# Altium PCB PCB1.PcbDoc (part 1 of 3)
Units mm, origin at the board's own origin, x right, y up, seen from the top; angles counter-clockwise.
Board outline 35.05 x 35.05 mm, 2 copper layers (Top Layer, Bottom Layer); 270 components, 213 nets, 927 pads, 0 vias.
Unrouted connection lines stored in the file: 589.
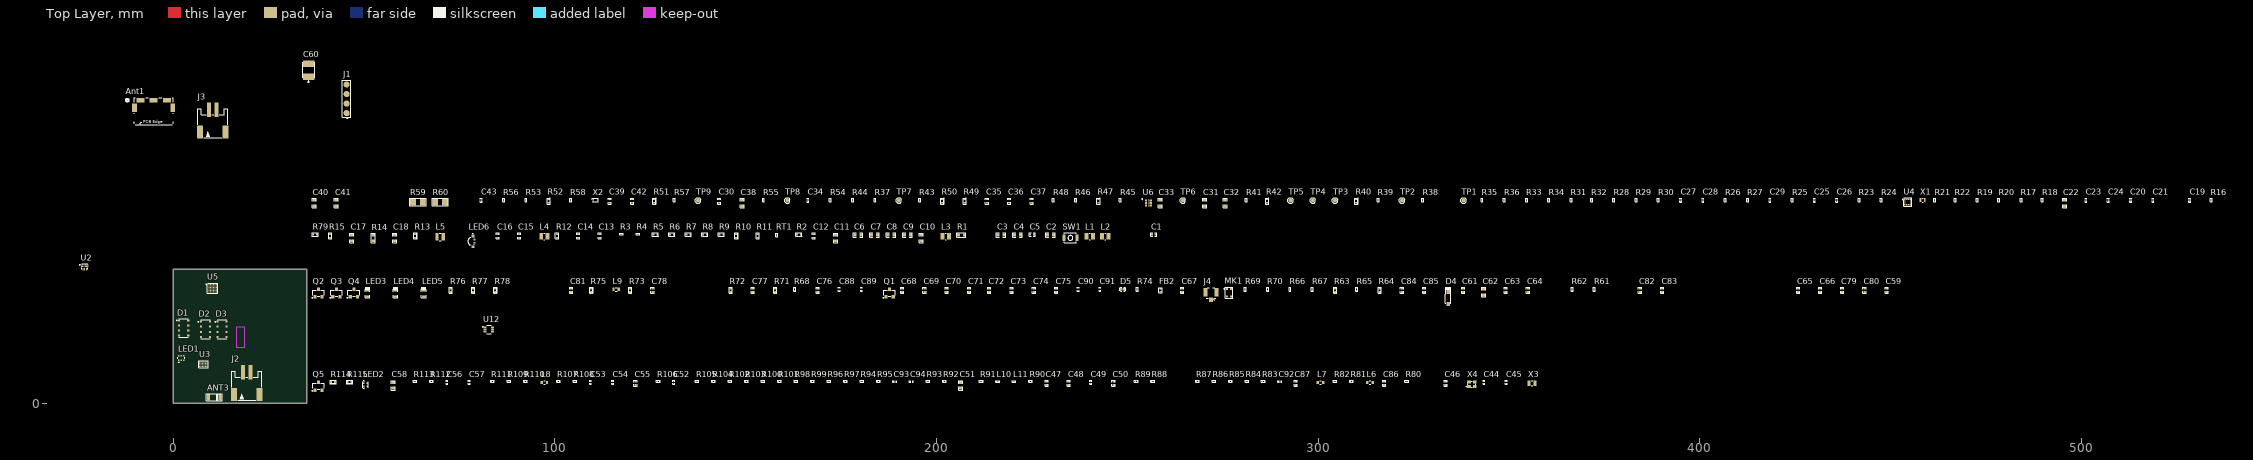
[diagram p0: Top Layer view]
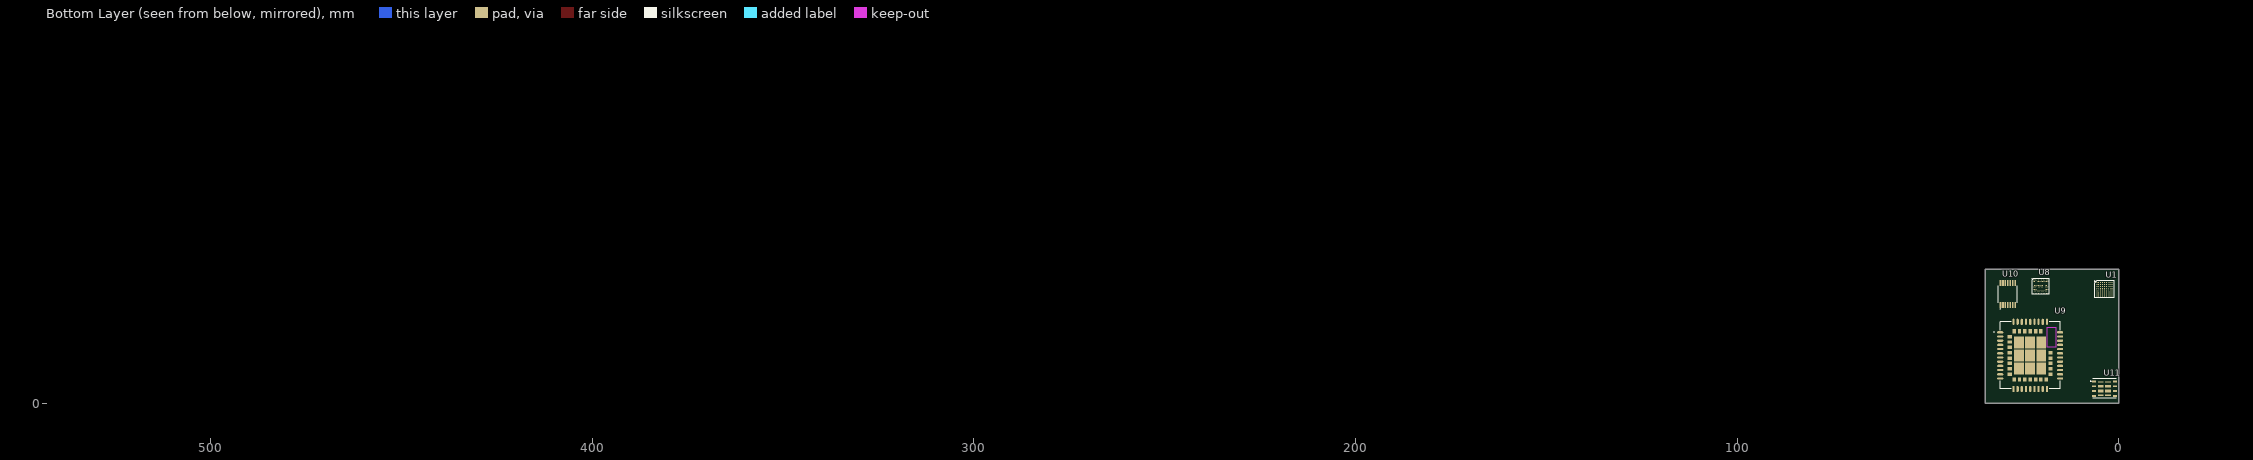
[diagram p1: Bottom Layer view, seen from below]

## Layer stack, top to bottom
Top Solder: solder mask 0.0102, Solder Resist, Dk 3.5
Top Layer: signal copper 0.0356
Dielectric 1: dielectric 0.32, FR-4, Dk 4.8
Bottom Layer: signal copper 0.0356
Bottom Solder: solder mask 0.0102, Solder Resist, Dk 3.5

## Board outline
0,0 35.052,0 35.052,35.052 0,35.052

## Design rules (kind name [scope] priority, off if disabled: settings)
Clearance [All] p1: gap=0.254 ignorepadtopadclearanceinfootprint=FALSE except(0: Arc-Hole Track-Hole SMDPad-Hole THPad-Hole Via-Hole Fill-Hole Poly-Hole Region-Hole Text-Hole)
DiffPairsRouting [All] p1: maxlimit=0.254 minlimit=0.254 mostfreqgap=0.254 toplayer_minwidth=0.381 toplayer_maxwidth=0.381 toplayer_prefwidth=0.381 bottomlayer_minwidth=0.381 bottomlayer_maxwidth=0.381 bottomlayer_prefwidth=0.381 maxuncoupledlength=12.7
PolygonConnect [All] p1: connectstyle=Relief reliefconductorwidth=0.254 reliefentries=4 polygonreliefangle="90 Angle" airgapwidth=0.254
RoutingVias [All] p1: holewidth=0.711 width=1.27 viastyle="Through Hole" minholewidth=0.711 minwidth=1.27 maxholewidth=0.711 maxwidth=1.27
SolderMaskExpansion [All] p1: expansion=0.102 istentingtop=FALSE
SupplyNets "Schematic Supply Nets_15" [InNet('VBUS')] p1: voltage=0.000
SupplyNets "Schematic Supply Nets_14" [InNet('5V')] p2: voltage=0.000
SupplyNets "Schematic Supply Nets_13" [InNet('VBAT')] p3: voltage=0.000
SupplyNets "Schematic Supply Nets_12" [InNet('3V3_SFO')] p4: voltage=0.000
SupplyNets "Schematic Supply Nets_11" [InNet('1V8_SLDO')] p5: voltage=0.000
SupplyNets "Schematic Supply Nets_10" [InNet('1V8_SB')] p6: voltage=0.000
SupplyNets "Schematic Supply Nets_9" [InNet('AGND')] p7: voltage=0.000
SupplyNets "Schematic Supply Nets_8" [InNet('GND')] p8: voltage=0.000
SupplyNets "Schematic Supply Nets_7" [InNet('3V3')] p9: voltage=0.000
SupplyNets "Schematic Supply Nets_6" [InNet('5V0_B')] p10: voltage=0.000
SupplyNets "Schematic Supply Nets_5" [InNet('VGSM')] p11: voltage=0.000
SupplyNets "Schematic Supply Nets_4" [InNet('VDD_EXT')] p12: voltage=0.000
SupplyNets "Schematic Supply Nets_3" [InNet('1V8_D')] p13: voltage=0.000
SupplyNets "Schematic Supply Nets_2" [InNet('VDD_uC')] p14: voltage=0.000
SupplyNets "Schematic Supply Nets_1" [InNet('VSYS')] p15: voltage=0.000
SupplyNets "Schematic Supply Nets" [InNet('1V8_S')] p16: voltage=0.000
Width [All] p1: maxlimit=0.254 minlimit=0.254 preferedwidth=0.254
29 further rules are at their usual default settings.

## Classes and differential pairs
component class U_Sensor-Sheet: C19 C20 C21 C22 C23 C24 C25 C26 C27 C28 C29 C30 C31 C32 C33 C34 C35 C36 C37 C38 C39 C40 C41 C42 C43 D1 D2 D3 LED1 R16 R17 R18 R19 R20 R21 R22 R23 R24 R25 R26 R27 R28 R29 R30 R31 R32 R33 R34 R35 R36 R37 R38 R39 R40 R41 R42 R43 R44 R45 R46 R47 R48 R49 R50 R51 R52 R53 R54 R55 R56 R57 R58 R59 R60 TP1 TP2 TP3 TP4 TP5 TP6 TP7 TP8 TP9 U3 U4 U5 U6 X1 X2
component class U_Power-Sheet: C1 C2 C3 C4 C5 C6 C7 C8 C9 C10 C11 C12 C13 C14 C15 C16 C17 C18 J1 J2 L1 L2 L3 L4 L5 LED6 R1 R2 R3 R4 R5 R6 R7 R8 R9 R10 R11 R12 R13 R14 R15 R79 RT1 SW1 U1 U2
component class U_GSM-Sheet: Ant1 C59 C60 C61 C62 C63 C64 C65 C66 C67 C68 C69 C70 C71 C72 C73 C74 C75 C76 C77 C78 C79 C80 C81 C82 C83 C84 C85 C88 C89 C90 C91 D4 D5 FB2 J3 J4 L9 LED3 LED4 LED5 MK1 Q1 Q2 Q3 Q4 R61 R62 R63 R64 R65 R66 R67 R68 R69 R70 R71 R72 R73 R74 R75 R76 R77 R78 U9 U10 U11 U12
component class U_Controller-Sheet: ANT3 C44 C45 C46 C47 C48 C49 C50 C51 C52 C53 C54 C55 C56 C57 C58 C86 C87 C93 C94 L6 L7 L8 L10 L11 LED2 Q5 R79 R80 R81 R82 R83 R84 R85 R86 R87 R88 R89 R90 R91 R92 R93 R94 R95 R96 R97 R98 R99 R100 R101 R102 R103 R104 R105 R106 R107 R108 R109 R110 R112 R113 R114 R115 U8 X3 X4
differential pair class SPK_Pair: LSPK
differential pair class MIC_Pair: MIC
net class SPK: LSPK_N LSPK_P
net class MIC: MIC_N MIC_P
differential pair MIC: +MIC_P -MIC_N
differential pair LSPK: +LSPK_P -LSPK_N

## Components (designator, comment, footprint, x,y, rotation, side; value= is the part's Value field where it differs from the comment)
Ant1 "AP.10H.01" AP.10H.01 -5.08,77.089 r0 top
ANT3 "2.4GHZ" RFANT3216120A5T 10.795,1.524 r180 top
C1 "2.2uF" Cap-0402 256.921,44.196 r0 top
C2 "10uF" Cap-0603 229.87,44.069 r0 top
C3 "10uF" Cap-0603 216.916,44.069 r0 top
C4 "10uF" Cap-0603 221.234,44.069 r0 top
C5 "4.7uF" Cap-0402 225.044,44.196 r0 top
C6 "10uF" Cap-0603 179.451,44.069 r0 top
C7 "10uF" Cap-0603 183.769,44.069 r0 top
C8 "22uF" Cap-0603 188.087,44.069 r0 top
C9 "22uF" Cap-0603 192.405,44.069 r0 top
C10 "22uF" Cap-0603 195.961,43.307 r90 top
C11 "10uF" Cap-0603 173.609,43.307 r90 top
C12 "100nF" Cap-0402 167.894,43.815 r90 top
C13 "4.7uF" Cap-0402 111.76,43.815 r90 top
C14 "2.2uF" Cap-0402 106.172,43.815 r90 top
C15 "4.7uF" Cap-0402 90.678,43.815 r90 top
C16 "4.7uF" Cap-0402 85.09,43.815 r90 top
C17 "22uF" Cap-0603 46.863,43.307 r90 top
C18 "22uF" Cap-0603 58.039,43.307 r90 top
C19 "1uF" CAP-0201 528.32,53.213 r90 top
C20 "0.1uF" CAP-0201 512.826,53.213 r90 top
C21 "1uF" CAP-0201 518.668,53.213 r90 top
C22 "10uF" Cap-0603 495.554,52.451 r90 top
C23 "0.1uF" CAP-0201 501.142,53.213 r90 top
C24 "0.1uF" CAP-0201 506.984,53.213 r90 top
C25 "0.1uF" CAP-0201 430.022,53.213 r90 top
C26 "1uF" CAP-0201 435.864,53.213 r90 top
C27 "DNP" CAP-0201 394.97,53.213 r90 top
C28 "DNP" CAP-0201 400.812,53.213 r90 top
C29 "4700pF" CAP-0201 418.338,53.213 r90 top value=4.7nF
C30 "DNP" Cap-0402 143.129,52.959 r90 top value=100nF
C31 "0.1uF" Cap-0603 270.256,52.451 r90 top
C32 "10uF" Cap-0603 275.59,52.451 r90 top
C33 "1uF" Cap-0603 258.572,52.451 r90 top
C34 "1uF" CAP-0201 166.37,53.213 r90 top
C35 "10uF" Cap-0402 213.233,52.959 r90 top
C36 "10uF" Cap-0402 219.075,52.959 r90 top
C37 "1uF" Cap-0402 224.917,52.959 r90 top
C38 "10uF" Cap-0603 149.098,52.451 r90 top
C39 "DNP" Cap-0402 114.427,52.959 r90 top value=100nF
C40 "10uF" Cap-0603 36.957,52.451 r90 top
C41 "10uF" Cap-0603 42.799,52.451 r90 top
C42 "DNP" Cap-0402 120.269,52.959 r90 top value=100nF
C43 "10nF" CAP-0201 80.772,53.213 r90 top
C44 "DNP" CAP-0201 343.408,5.461 r90 top
C45 "DNP" CAP-0201 349.25,5.461 r90 top
C46 "1uF" Cap-0402 333.375,5.207 r90 top
C47 "1uF" Cap-0402 228.854,5.207 r90 top
C48 "1uF" Cap-0402 234.696,5.207 r90 top
C49 "0.1uF" CAP-0201 240.411,5.461 r90 top
C50 "1uF" Cap-0402 246.38,5.207 r90 top
C51 "4.7uF" Cap-0603 206.375,4.699 r90 top
C52 "0.1uF" CAP-0201 131.191,5.461 r90 top
C53 "0.1uF" CAP-0201 109.347,5.461 r90 top
C54 "0.1uF" CAP-0201 115.189,5.461 r90 top
C55 "1uF" Cap-0402 121.158,5.207 r90 top
C56 "0.1uF" CAP-0201 71.755,5.461 r90 top
C57 "0.1uF" CAP-0201 77.597,5.461 r90 top
C58 "2.2uF" Cap-0603 57.658,4.699 r90 top
C59 "0.1uF" Cap-0402 448.945,29.591 r90 top value=100nF
C60 "100uF" Case-B 35.56,87.249 r90 top
C61 "100nF" Cap-0402 337.947,29.591 r90 top
C62 "10uF" CAP-0603 343.408,29.083 r90 top
C63 "10pF" Cap-0402 349.123,29.591 r90 top
C64 "30pF" Cap-0402 354.965,29.591 r90 top
C65 "100nF" Cap-0402 425.704,29.591 r90 top
C66 "100nF" Cap-0402 431.546,29.591 r90 top
C67 "10uF" Cap-0402 264.414,29.591 r90 top
C68 "10pF" Cap-0402 191.008,29.591 r90 top
C69 "30pF" Cap-0402 196.85,29.591 r90 top
C70 "10pF" Cap-0402 202.692,29.591 r90 top
C71 "30pF" Cap-0402 208.534,29.591 r90 top
C72 "33pF" Cap-0402 213.868,29.591 r90 top
C73 "33pF" Cap-0402 219.71,29.591 r90 top
C74 "0.1uF" Cap-0402 225.552,29.591 r90 top value=100nF
C75 "10uF" Cap-0402 231.394,29.591 r90 top
C76 "100nF" Cap-0402 168.91,29.591 r90 top
C77 "33pF" Cap-0402 151.892,29.591 r90 top
C78 "33pF" Cap-0402 125.603,29.591 r90 top
C79 "10pF" Cap-0402 437.261,29.591 r90 top
C80 "30pF" Cap-0402 443.103,29.591 r90 top
C81 "33pF" Cap-0402 104.267,29.591 r90 top
C82 "10pF" Cap-0402 384.302,29.591 r90 top
C83 "30pF" Cap-0402 390.144,29.591 r90 top
C84 "10pF" Cap-0402 321.945,29.591 r90 top
C85 "30pF" Cap-0402 327.787,29.591 r90 top
C86 "1uF" Cap-0402 317.246,5.207 r90 top
C87 "1uF" Cap-0402 294.132,5.207 r90 top
C88 "DNP" CAP-0201 174.498,29.845 r90 top
C89 "DNP" CAP-0201 180.34,29.845 r90 top
C90 "DNP" CAP-0201 237.109,29.845 r90 top
C91 "DNP" CAP-0201 242.824,29.845 r90 top
C92 "2.2nF" CAP-0201 289.941,5.715 r0 top
C93 "0.7pF" CAP-0201 189.103,5.715 r0 top
C94 "DNP" CAP-0201 193.421,5.715 r0 top
D1 "VEMD8080" VEMD8080 2.794,19.685 r0 top
D2 "VEMD8080" VEMD8080 8.462,19.359 r0 top
D3 "VEMD8080" VEMD8080 12.827,19.359 r0 top
D4 "MMSZ5231BT1G" SOD-123 334.01,27.559 r90 top
D5 "LXES15AAA1-153" "DFN1006-2L (Bi-Directional)" 248.793,29.845 r0 top
FB2 "100MHz" IND-0402 258.699,29.591 r90 top
J1 "POGO Connector 4 Pin" "Pogo 4 Pin" 45.466,79.736 r90 top
J2 "S2B-PH-SM4-TB(LF)(SN)" S2B-PH-SM4-TB(LF)(SN) 19.304,5.207 r0 top
J3 "S2B-PH-SM4-TB(LF)(SN)" S2B-PH-SM4-TB(LF)(SN) 10.414,73.914 r0 top
J4 "U.FL-R-SMT-1(80)" U.FL-R-SMT-1(80)_ 271.907,28.067 r0 top
L1 "2.2uH" IND-0806 240.157,43.688 r0 top
L2 "2.2uH" IND-0806 244.221,43.688 r0 top
L3 "2.2uH" IND-0806 202.438,43.688 r0 top
L4 "2.2uH" IND-0806 97.282,43.688 r0 top
L5 "1uH" WPN252012H1R0MT_ 69.977,43.561 r0 top
L6 "10uH" "IND-0603 (1608 Metric)" 313.563,5.461 r0 top value=1.05R
L7 "10uH" "IND-0603 (1608 Metric)" 300.609,5.461 r0 top value=1.05R
L8 "10uH" "IND-0603 (1608 Metric)" 97.282,5.461 r0 top value=1.05R
L9 "68nH" "IND-0603 (1608 Metric)" 116.078,29.845 r0 top
L10 "2.2nH" IND-0201 216.027,5.715 r0 top value=120mR
L11 "2.2nH" IND-0201 220.345,5.715 r0 top value=120mR
LED1 "SFH 7016" "SFH 7016" 2.159,11.811 r90 top
LED2 "XL-1010RGBC-WS2812B" XL-1010RGBC-WS2812B 50.419,4.826 r90 top
LED3 "Yellow" LED-0603 50.927,28.702 r90 top
LED4 "RED" LED-0603 58.293,28.702 r90 top
LED5 "Emerald" LED-0603 65.659,28.702 r90 top
LED6 "MHS110FRGBCT" MHS110FRGBCT 78.74,42.418 r90 top
MK1 "ZTS6117" ZTS6117_ 276.606,28.956 r0 top
Q1 "DDTC143ZCA-7-F" SOT-23 187.706,28.829 r0 top
Q2 "DDTC143ZCA-7-F" SOT-23 38.1,28.829 r0 top
Q3 "DDTC143ZCA-7-F" SOT-23 42.799,28.829 r0 top
Q4 "DDTC143ZCA-7-F" SOT-23 47.371,28.829 r0 top
Q5 "BSS138" Sot-23 38.1,4.445 r0 top
R1 "25K" Res-0603 206.502,44.069 r0 top
R2 "10K" Res-0402 163.957,44.196 r0 top
R3 "4.7K" Res-0201 117.475,44.323 r0 top
R4 "4.7K" Res-0201 121.793,44.323 r0 top
R5 "10K" Res-0402 126.365,44.196 r0 top
R6 "10K" Res-0402 130.683,44.196 r0 top
R7 "10K" Res-0402 135.001,44.196 r0 top
R8 "10K" Res-0402 139.319,44.196 r0 top
R9 "10K" Res-0402 143.637,44.196 r0 top
R10 "10K" Res-0402 147.574,43.815 r90 top
R11 "4.7K" Res-0402 153.162,43.815 r90 top
R12 "10mR" Res-0402 100.584,43.815 r90 top
R13 "100K" Res-0402 63.5,43.815 r90 top
R14 "215K" Res-0603 52.451,43.307 r90 top
R15 "43k" Res-0402 41.148,43.815 r90 top
R16 "10R" Res-0201 533.908,53.213 r90 top
R17 "0R" Res-0201 484.124,53.213 r90 top
R18 "0R" Res-0201 489.712,53.213 r90 top
R19 "0R" Res-0201 472.694,53.213 r90 top
R20 "0R" Res-0201 478.282,53.213 r90 top
R21 "0R" Res-0201 461.518,53.213 r90 top
R22 "0R" Res-0201 466.852,53.213 r90 top
R23 "3.3K" Res-0201 441.706,53.213 r90 top
R24 "DNP" Res-0201 447.548,53.213 r90 top
R25 "0R" Res-0201 424.18,53.213 r90 top
R26 "10K" Res-0201 406.654,53.213 r90 top
R27 "0R" Res-0201 412.496,53.213 r90 top
R28 "0R" Res-0201 377.444,53.213 r90 top
R29 "0R" Res-0201 383.286,53.213 r90 top
R30 "0R" Res-0201 389.128,53.213 r90 top
R31 "0R" Res-0201 366.268,53.213 r90 top
R32 "DNP" Res-0201 371.602,53.213 r90 top
R33 "0R" Res-0201 354.584,53.213 r90 top
R34 "0R" Res-0201 360.426,53.213 r90 top
R35 "3.3K" Res-0201 342.9,53.213 r90 top
R36 "10K" Res-0201 348.742,53.213 r90 top
R37 "0R" Res-0201 183.896,53.213 r90 top
R38 "DNP" Res-0201 327.406,53.213 r90 top
R39 "0R" Res-0201 315.722,53.213 r90 top
R40 "DNP" Res-0402 310.007,52.959 r90 top
R41 "0R" Res-0201 281.178,53.213 r90 top
R42 "DNP" Res-0402 286.639,52.959 r90 top
R43 "10K" Res-0201 195.58,53.213 r90 top
R44 "DNP" Res-0201 178.054,53.213 r90 top
R45 "0R" Res-0201 248.158,53.213 r90 top
R46 "0R" Res-0201 236.474,53.213 r90 top
R47 "DNP" Res-0402 242.443,52.959 r90 top
R48 "0R" Res-0201 230.632,53.213 r90 top
R49 "DNP" Res-0402 207.391,52.959 r90 top
R50 "100K" Res-0402 201.549,52.959 r90 top
R51 "10K" Res-0402 126.111,52.959 r90 top
R52 "10K" Res-0402 98.425,52.959 r90 top
R53 "DNP" Res-0201 92.456,53.213 r90 top
R54 "DNP" Res-0201 172.212,53.213 r90 top
R55 "0R" Res-0201 154.686,53.213 r90 top
R56 "DNP" Res-0201 86.614,53.213 r90 top
R57 "0R" Res-0201 131.318,53.213 r90 top
R58 "0R" Res-0201 104.14,53.213 r90 top
R59 "0R" Res-1206 64.135,52.705 r0 top value=0mR
R60 "0R" Res-1206 69.977,52.705 r0 top value=0mR
R61 "0R" Res-0201 372.364,29.845 r90 top
R62 "0R" Res-0201 366.522,29.845 r90 top
R63 "10K" Res-0402 304.419,29.591 r90 top
R64 "DNP" Res-0402 316.103,29.591 r90 top
R65 "0R" Res-0201 310.134,29.845 r90 top
R66 "0R" Res-0201 292.608,29.845 r90 top
R67 "0R" Res-0201 298.45,29.845 r90 top
R68 "0R" Res-0201 162.814,29.845 r90 top
R69 "0R" Res-0201 280.924,29.845 r90 top
R70 "0R" Res-0201 286.766,29.845 r90 top
R71 "22R" Res-0402 157.734,29.591 r90 top
R72 "22R" Res-0402 146.05,29.591 r90 top
R73 "22R" Res-0402 119.761,29.591 r90 top
R74 "0R" Res-0201 252.603,29.845 r90 top
R75 "22R" Res-0402 109.601,29.591 r90 top
R76 "1K" Res-0402 72.771,29.591 r90 top
R77 "1K" Res-0402 78.613,29.591 r90 top
R78 "1K" Res-0402 84.455,29.591 r90 top
R79 "100K" Res-0402 37.211,44.196 r0 top
R80 "0R" Res-0201 323.215,5.715 r0 top
R81 "0R" Res-0201 308.737,5.715 r0 top
R82 "0R" Res-0201 304.419,5.715 r0 top
R83 "0R" Res-0201 285.623,5.715 r0 top
R84 "0R" Res-0201 281.305,5.715 r0 top
R85 "0R" Res-0201 276.987,5.715 r0 top
R86 "0R" Res-0201 272.669,5.715 r0 top
R87 "0R" Res-0201 268.351,5.715 r0 top
R88 "0R" Res-0201 256.667,5.715 r0 top
R89 "0R" Res-0201 252.349,5.715 r0 top
R90 "0R" Res-0201 224.663,5.715 r0 top
R91 "0R" Res-0201 211.709,5.715 r0 top
R92 "0R" Res-0201 202.057,5.715 r0 top
R93 "0R" Res-0201 197.739,5.715 r0 top
R94 "0R" Res-0201 180.467,5.715 r0 top
R95 "0R" Res-0201 184.785,5.715 r0 top
R96 "0R" Res-0201 171.831,5.715 r0 top
R97 "0R" Res-0201 176.149,5.715 r0 top
R98 "0R" Res-0201 163.195,5.715 r0 top
R99 "0R" Res-0201 167.513,5.715 r0 top
R100 "0R" Res-0201 154.559,5.715 r0 top
R101 "0R" Res-0201 158.877,5.715 r0 top
R102 "0R" Res-0201 145.923,5.715 r0 top
R103 "0R" Res-0201 150.241,5.715 r0 top
R104 "0R" Res-0201 141.605,5.715 r0 top
R105 "0R" Res-0201 137.287,5.715 r0 top
R106 "0R" Res-0201 127.127,5.715 r0 top
R107 "0R" Res-0201 100.965,5.715 r0 top
R108 "0R" Res-0201 105.283,5.715 r0 top
R109 "0R" Res-0201 88.011,5.715 r0 top
R110 "0R" Res-0201 92.329,5.715 r0 top
R111 "0R" Res-0201 83.693,5.715 r0 top
R112 "0R" Res-0201 67.691,5.715 r0 top
R113 "0R" Res-0201 63.373,5.715 r0 top
R114 "10K" Res-0402 41.91,5.588 r0 top
R115 "10K" Res-0402 46.228,5.588 r0 top
RT1 "10K" Res-0201 158.115,44.069 r90 top value=10kR
SW1 "B3U-1000P" B3U-1000P 235.077,43.307 r0 top
TP1 "TEST POINT 0.5mm Dia" "Test-point - 0.5mm" 338.074,53.086 r90 top
TP2 "TEST POINT 0.5mm Dia" "Test-point - 0.5mm" 321.945,53.086 r90 top
TP3 "TEST POINT 0.5mm Dia" "Test-point - 0.5mm" 304.419,53.086 r90 top
TP4 "TEST POINT 0.5mm Dia" "Test-point - 0.5mm" 298.577,53.086 r90 top
TP5 "TEST POINT 0.5mm Dia" "Test-point - 0.5mm" 292.735,53.086 r90 top
TP6 "TEST POINT 0.5mm Dia" "Test-point - 0.5mm" 264.541,53.086 r90 top
TP7 "TEST POINT 0.5mm Dia" "Test-point - 0.5mm" 190.119,53.086 r90 top
TP8 "TEST POINT 0.5mm Dia" "Test-point - 0.5mm" 160.909,53.086 r90 top
TP9 "TEST POINT 0.5mm Dia" "Test-point - 0.5mm" 137.541,53.086 r90 top
U1 "MAX20360AEWZ+" "72-WLP (4.88x4.19)" 5.804,31.599 r180 bottom
U2 "SY8843QWC" QFN-7(1.5x1.5) -23.241,35.687 r0 top
U3 "MAX32674CGWG+" "24-WLP (2.5x1.75)" 7.947,10.214 r0 top
U4 "LIS2DS12" "12-LGA (2x2)" 454.406,52.705 r0 top
U5 "MAX86176ENX+T" "36-WLP (2.728x2.708)" 10.379,30.115 r0 top
U6 "MAX30208CLB+T" IC_MAX30208CLB+T 255.524,52.451 r0 top
U8 "NRF5340-CLAA-R7" "95-WLCSP (4.39x3.85)" 20.526,30.48 r180 bottom
U9 "SIM868" XCVR_SIM868 23.25,12.523 r180 bottom
U10 "TXB0104PWR" 14-TSSOP 29.083,28.575 r90 bottom
U11 "MFFX-M2M UICC" MFFX 3.795,3.81 r180 bottom
U12 "DNP" SOT-363 82.723,19.304 r0 top
X1 "32.768kHz" SMD1610-2P 458.343,53.213 r0 top
X2 "32.768 kHz" SIT1572AI-J3-18E-DCC-32.768E 110.617,53.213 r0 top
X3 "32.768 KHz" "2-SMD, (2.00mm x 1.20mm)" 355.981,5.207 r0 top
X4 "32.0MHz" SMD2016-4P 340.233,4.953 r0 top

## Footprints (in the part's own frame and the unit in brackets; to place one, negate y for a bottom-side part, rotate by r counter-clockwise, add the part's x,y. Pads: shape width x height; smd on the part's side, far side on the other; paste and mask are expansions set on the pad)
"2-SMD, (2.00mm x 1.20mm)" [mm]
  rect 0.8x1.5 smd: 1(-0.75,0) 2(0.75,0)
  silkscreen extent -0.15,-0.66 0.18,0.66, body extent -1,-0.6 1,0.6, height 0.35
"12-LGA (2x2)" [mm]
  rect 0.4x0.35 smd mask+0.05: 1(-0.76,0.75) 2(-0.76,0.25) 3(-0.76,-0.25) 4(-0.76,-0.75) 7(0.76,-0.75) 8(0.76,-0.25) 9(0.76,0.25) 10(0.76,0.75)
  rect 0.35x0.4 smd mask+0.05: 5(-0.25,-0.76) 6(0.25,-0.76) 11(0.25,0.76) 12(-0.25,0.76)
  silkscreen extent -1.24,-1.07 1.07,1.07, body extent -1,-1 1,1, height 0.7
14-TSSOP [mm]
  rect 1.57x0.41 smd: 1(-2.87,1.95) 2(-2.87,1.3) 3(-2.87,0.65) 4(-2.87,0) 5(-2.87,-0.65) 6(-2.87,-1.3) 7(-2.87,-1.95) 8(2.87,-1.95) 9(2.87,-1.3) 10(2.87,-0.65) 11(2.87,0) 12(2.87,0.65) 13(2.87,1.3) 14(2.87,1.95)
  silkscreen extent -3.98,-2.5 2.2,2.5, body extent -3.2,-2.5 3.2,2.5, height 1.2
"24-WLP (2.5x1.75)" [mm]
  round 0.25 smd mask+0.055: A1(-1,0.6) A2(-0.6,0.6) A3(-0.2,0.6) A4(0.2,0.6) A5(0.6,0.6) A6(1,0.6) B1(-1,0.2) B2(-0.6,0.2) B3(-0.2,0.2) B4(0.2,0.2) B5(0.6,0.2) B6(1,0.2) C1(-1,-0.2) C2(-0.6,-0.2) C3(-0.2,-0.2) C4(0.2,-0.2) C5(0.6,-0.2) C6(1,-0.2) D1(-1,-0.6) D2(-0.6,-0.6) D3(-0.2,-0.6) D4(0.2,-0.6) D5(0.6,-0.6) D6(1,-0.6)
  silkscreen extent -1.3,-0.87 1.25,0.97, body extent -1.25,-0.87 1.25,0.87, height 0.59
"36-WLP (2.728x2.708)" [mm]
  round 0.25 smd paste+0 mask+0.04: A1(-1,1) A2(-0.6,1) A3(-0.2,1) A4(0.2,1) A5(0.6,1) A6(1,1) B1(-1,0.6) B2(-0.6,0.6) B3(-0.2,0.6) B4(0.2,0.6) B5(0.6,0.6) B6(1,0.6) C1(-1,0.2) C2(-0.6,0.2) C3(-0.2,0.2) C4(0.2,0.2) C5(0.6,0.2) C6(1,0.2) D1(-1,-0.2) D2(-0.6,-0.2) D3(-0.2,-0.2) D4(0.2,-0.2) D5(0.6,-0.2) D6(1,-0.2) E1(-1,-0.6) E2(-0.6,-0.6) E3(-0.2,-0.6) E4(0.2,-0.6) E5(0.6,-0.6) E6(1,-0.6) F1(-1,-1) F2(-0.6,-1) F3(-0.2,-1) F4(0.2,-1) F5(0.6,-1) F6(1,-1)
  silkscreen extent -1.63,-1.36 1.35,1.36, body extent -1.35,-1.36 1.35,1.36, height 0.43
"72-WLP (4.88x4.19)" [mil]
  round 10 smd mask+2.17: A1(0,0) A2(19.69,0) A3(39.37,0) A4(59.06,0) A5(78.74,0) A6(98.43,0) A7(118.11,0) A8(137.8,0) A9(157.48,0) B1(0,-19.69) B2(19.69,-19.69) B3(39.37,-19.69) B4(59.06,-19.69) B5(78.74,-19.69) B6(98.43,-19.69) B7(118.11,-19.69) B8(137.8,-19.69) B9(157.48,-19.69) C1(0,-39.38) C2(19.69,-39.38) C3(39.37,-39.38) C4(59.06,-39.38) C5(78.74,-39.38) C6(98.43,-39.38) C7(118.11,-39.38) C8(137.8,-39.38) C9(157.48,-39.38) D1(0,-59.07) D2(19.69,-59.07) D3(39.37,-59.07) D4(59.06,-59.07) D5(78.74,-59.07) D6(98.43,-59.07) D7(118.11,-59.07) D8(137.8,-59.07) D9(157.48,-59.07) E1(0,-78.76) E2(19.69,-78.76) E3(39.37,-78.76) E4(59.06,-78.76) E5(78.74,-78.76) E6(98.43,-78.76) E7(118.11,-78.76) E8(137.8,-78.76) E9(157.48,-78.76) F1(0,-98.45) F2(19.69,-98.45) F3(39.37,-98.45) F4(59.06,-98.45) F5(78.74,-98.45) F6(98.43,-98.45) F7(118.11,-98.45) F8(137.8,-98.45) F9(157.48,-98.45) G1(0,-118.14) G2(19.69,-118.14) G3(39.37,-118.14) G4(59.06,-118.14) G5(78.74,-118.14) G6(98.43,-118.14) G7(118.11,-118.14) G8(137.8,-118.14) G9(157.48,-118.14) H1(0,-137.83) H2(19.69,-137.83) H3(39.37,-137.83) H4(59.06,-137.83) H5(78.74,-137.83) H6(98.43,-137.83) H7(118.11,-137.83) H8(137.8,-137.83) H9(157.48,-137.83)
  silkscreen extent -21,-155 178,17, body extent -18,-152 175,14, height 27
"95-WLCSP (4.39x3.85)" [mm]
  round 0.17 smd mask+0.05: A1(-1.925,1.75) A2(-1.575,1.75) A3(-1.225,1.75) A5(-0.525,1.75) A7(0.175,1.75) A9(0.875,1.75) A11(1.575,1.75) A12(1.925,1.75) B1(-1.925,1.4) B2(-1.575,1.4) B4(-0.875,1.4) B5(-0.525,1.4) B6(-0.175,1.4) B7(0.175,1.4) B8(0.525,1.4) B9(0.875,1.4) B10(1.225,1.4) B11(1.575,1.4) B12(1.925,1.4) C2(-1.575,1.05) C4(-0.875,1.05) C5(-0.525,1.05) C6(-0.175,1.05) C7(0.175,1.05) C8(0.525,1.05) C9(0.875,1.05) C10(1.225,1.05) C11(1.575,1.05) D1(-1.925,0.7) D2(-1.575,0.7) D10(1.225,0.7) D11(1.575,0.7) D12(1.925,0.7) E2(-1.575,0.35) E3(-1.225,0.35) E4(-0.875,0.35) E5(-0.525,0.35) E6(-0.175,0.35) E7(0.175,0.35) E8(0.525,0.35) E10(1.225,0.35) E11(1.575,0.35) F1(-1.925,0) F2(-1.575,0) F3(-1.225,0) F5(-0.525,0) F6(-0.175,0) F7(0.175,0) F8(0.525,0) F10(1.225,0) F11(1.575,0) F12(1.925,0) G2(-1.575,-0.35) G3(-1.225,-0.35) G5(-0.525,-0.35) G6(-0.175,-0.35) G7(0.175,-0.35) G8(0.525,-0.35) G10(1.225,-0.35) G11(1.575,-0.35) H1(-1.925,-0.7) H2(-1.575,-0.7) H3(-1.225,-0.7) H10(1.225,-0.7) H11(1.575,-0.7) H12(1.925,-0.7) J2(-1.575,-1.05) J3(-1.225,-1.05) J4(-0.875,-1.05) J5(-0.525,-1.05) J6(-0.175,-1.05) J7(0.175,-1.05) J8(0.525,-1.05) J9(0.875,-1.05) J10(1.225,-1.05) J11(1.575,-1.05) K1(-1.925,-1.4) K2(-1.575,-1.4) K3(-1.225,-1.4) K4(-0.875,-1.4) K5(-0.525,-1.4) K6(-0.175,-1.4) K7(0.175,-1.4) K8(0.525,-1.4) K9(0.875,-1.4) K10(1.225,-1.4) K11(1.575,-1.4) K12(1.925,-1.4) L1(-1.925,-1.75) L3(-1.225,-1.75) L5(-0.525,-1.75) L7(0.175,-1.75) L9(0.875,-1.75) L11(1.575,-1.75) L12(1.925,-1.75)
  silkscreen extent -2.24,-1.98 2.31,2.21, body extent -2.13,-1.93 2.26,2.06, height 0.41
AP.10H.01 [mil]
  rect 83x49 smd: 1(0,90.05) 2(-137.8,90.05) 3(137.8,90.05)
  rect 49x83 smd: 4(-197.05,12.25) 5(197.05,12.25)
  round 0 hole 59 unplated paste-99999 mask-29.5: 6(-190.94,-90.05) 7(190.94,-90.05)
  silkscreen extent -287,-165 202,116, body extent -217,-362 217,110, height 276
B3U-1000P [mm] "SWITCH TACTILE SPST-NO 0.05A 12V"
  rect 0.82x1.72 smd: 1(-1.7,0) 2(1.7,0)
  silkscreen extent -1.57,-1.3 1.57,1.3, body extent -2,-1.26 2,1.24, height 1.6
CAP-0201 [mm]
  rect 0.3x0.3 smd mask+0.055: 1(-0.3,0) 2(0.3,0)
  silkscreen extent -0.53,-0.23 0.53,0.23, body extent -0.3,-0.15 0.3,0.15, height 0.28
Cap-0402 [mil]
  rect 18x25 smd mask+2.36: 1(-18.5,0) 2(18.5,0)
  silkscreen extent -31,-16 31,16, body extent -20,-10 20,10, height 19
Cap-0603 [mil]
  rect 30x35 smd mask+2.36: 1(-30,0) 2(30,0)
  silkscreen extent -49,-21 49,21, body extent -32,-16 31,16, height 34
CAP-0603 [mil]
  rect 30x35 smd mask+2.36: 1(-30,0) 2(30,0)
  silkscreen extent -49,-21 49,21, body extent -32,-16 31,16, height 34
Case-B [mm]
  rect 1.7x3 smd paste+0: 1(-1.7,0) 2(1.7,0)
  silkscreen extent -3.35,-1.63 2.03,1.63, body extent -1.85,-1.5 1.85,1.5, height 2.16
"DFN1006-2L (Bi-Directional)" [mm]
  rect 0.4x0.7 smd paste+0 mask+0.051: 1(-0.325,0) 2(0.325,0)
  silkscreen extent -0.78,-0.47 0.78,0.47, body extent -0.5,-0.3 0.5,0.3, height 0.47
IC_MAX30208CLB+T [mm]
  rect 0.55x0.45 smd: 1(-0.6,0.65) 2(-0.6,0) 3(-0.6,-0.65) 4(0.6,-0.65) 5(0.6,0) 6(0.6,0.65)
  rect 0.25x0.3 smd: 7(0,0.75) 8(0,0.25) 9(0,-0.25) 10(0,-0.75)
  silkscreen extent -1.7,0.9 -1.5,1.1
IND-0201 [mm]
  rect 0.25x0.3 smd mask+0.055: 1(-0.275,0) 2(0.275,0)
  silkscreen extent -0.48,-0.23 0.48,0.23, body extent -0.3,-0.15 0.3,0.15, height 0.15
IND-0402 [mm]
  rect 0.4x0.6 smd: 1(-0.35,0) 2(0.35,0)
  silkscreen extent -0.71,-0.46 0.71,0.46, body extent -0.5,-0.25 0.5,0.25, height 0.25
"IND-0603 (1608 Metric)" [mm] "0.063\" L x 0.032\" W (1.60mm x 0.80mm)"
  rect 0.6x0.8 smd: 1(-0.7,0) 2(0.7,0)
  silkscreen extent -0.2,-0.46 0.23,0.46, body extent -0.8,-0.4 0.8,0.4, height 0.78
IND-0806 [mm]
  rect 1x1.72 smd: 1(-0.825,0) 2(0.825,0)
  silkscreen extent -0.13,-0.86 0.15,0.86, body extent -1,-0.8 1,0.8, height 1.2
LED-0603 [mm]
  rect 0.5x1 smd: 1(-0.75,0) 2(0.75,0)
  silkscreen extent -1.12,-0.66 1.75,0.66, body extent -0.82,-0.37 0.82,0.36, height 0.68
MFFX [mm]
  rect 1.5x0.35 smd paste-1.27: 0(-0.95,-1.73) 0(-0.95,1.73) 0(0.95,-1.73) 0(0.95,1.73)
  rect 1.5x0.7 smd paste-1.27: 0(-0.95,-0.635) 0(-0.95,0.635) 0(0.95,-0.635) 0(0.95,0.635)
  rect 1.1x0.5 smd paste-1.27: 1(-2.75,1.905) 2(-2.75,0.635) 3(-2.75,-0.635) 4(-2.75,-1.905) 5(2.75,-1.905) 6(2.75,-0.635) 7(2.75,0.635) 8(2.75,1.905)
  silkscreen extent -3.61,-2.58 3.08,2.58, body extent -3,-2.5 3,2.5, height 0.65
MHS110FRGBCT [mm]
  rect 0.7x0.8 smd: 1(1.4,0.2) 4(-1.4,0.2)
  rect 0.5x0.55 smd: 2(0.4,-0.2) 3(-0.4,-0.2)
  silkscreen extent -0.97,-0.1 2.11,1.43, body extent -1.6,-0.05 1.6,1.44, height 1.01
"Pogo 4 Pin" [mm]
  round 1.6 smd: 1(-3.75,0) 2(-1.25,0) 3(1.25,0) 4(3.75,0)
  silkscreen extent -5.11,-1.09 4.83,1.09
QFN-7(1.5x1.5) [mm]
  rect 0.7x0.25 smd paste+0 mask+0.05: 1(-0.55,0.563) 2(-0.55,0.113)
  rect 0.25x0.7 smd paste+0 mask+0.05: 3(-0.35,-0.563) 4(0.1,-0.562) 5(0.55,-0.562)
  rect 1.1x0.25 smd paste+0 mask+0.05: 6(0.55,0.113) 7(0.55,0.563)
  silkscreen extent -1.15,-0.66 0.85,0.84, body extent -0.65,-0.67 0.85,0.83, height 0.56
Res-0201 [mm]
  rect 0.27x0.37 smd mask+0.055: 1(-0.275,0) 2(0.275,0)
  silkscreen extent -0.48,-0.25 0.48,0.25, body extent -0.3,-0.15 0.3,0.15, height 0.29
Res-0402 [mil]
  rect 18x25 smd mask+2.17: 1(-18.5,0) 2(18.5,0)
  silkscreen extent -32,-17 32,16, body extent -23,-11 23,11, height 16
Res-0603 [mil]
  rect 30x35 smd: 1(-30,0) 2(30,0)
  silkscreen extent -48,-21 48,21, body extent -31,-17 31,17, height 18
Res-1206 [mil]
  rect 60x70 smd: 1(-50,0) 2(50,0)
  silkscreen extent -84,-39 84,39, body extent -63,-31 63,31, height 24
RFANT3216120A5T [mm]
  rect 0.8x1.66 smd paste+0 mask+0.051: 1(-1.55,0) 2(1.55,0)
  silkscreen extent -2.06,-0.99 2.06,0.97, body extent -1.6,-0.8 1.6,0.8, height 1.2
S2B-PH-SM4-TB(LF)(SN) [mm]
  rect 1x3.8 smd paste+0 mask+0.051: 1(-1,2.925) 2(1,2.925)
  rect 1.5x3.4 smd paste+0 mask+0.051: 3(3.35,-2.925) 4(-3.35,-2.925)
  silkscreen extent -3.95,-4.37 3.95,3.22, body extent -3.95,-4.4 3.95,4.2, height 5.5
"SFH 7016" [mm]
  rect 0.4x0.4 smd: 1(-0.575,0.65) 2(0.575,0.65) 3(-0.575,0) 4(0.575,0) 5(-0.575,-0.65) 6(0.575,-0.65)
  silkscreen extent -1.08,-0.97 0.2,0.97, body extent -0.82,-0.92 0.82,0.92, height 0.58
SIT1572AI-J3-18E-DCC-32.768E [mm]
  round 0.25 smd mask+0.05: 1(-0.5,-0.205) 2(0.5,-0.205) 3(0.5,0.205) 4(-0.5,0.205)
  silkscreen extent -0.86,-0.48 0.81,0.48, body extent -0.77,-0.43 0.77,0.43, height 0.61
SMD1610-2P [mm]
  rect 0.5x1 smd: 1(-0.55,0) 2(0.55,0)
  silkscreen extent -0.13,-0.53 0.13,0.53, body extent -0.8,-0.5 0.8,0.5, height 0.5
SMD2016-4P [mm]
  rect 1x0.8 smd paste+0 mask+0.051: 1(-0.75,-0.6) 2(0.75,-0.6) 3(0.75,0.6) 4(-0.75,0.6)
  silkscreen extent -1.42,-0.84 1.04,0.84, body extent -1,-0.8 1,0.8, height 0.47
SOD-123 [mm]
  rect 0.95x0.9 smd: 1(-1.575,0) 2(1.575,0)
  silkscreen extent -1.37,-0.8 2.82,0.8, body extent -1.82,-0.78 1.83,0.78, height 1.5
SOT-23 [mm] "TRANS NPN 40V 0.6A SOT23"
  rect 0.82x0.92 smd: 1(-0.95,-1) 2(0.95,-1) 3(0,1)
  silkscreen extent -1.68,-1.3 1.55,0.81, body extent -1.5,-1.25 1.5,1.25, height 1.05
Sot-23 [mm] "TRANS NPN 40V 0.6A SOT23"
  rect 0.82x0.92 smd: 1(-0.95,-1) 2(0.95,-1) 3(0,1)
  silkscreen extent -1.68,-1.3 1.55,0.81, body extent -1.5,-1.25 1.5,1.25, height 1.05
SOT-363 [mm]
  rect 0.8x0.4 smd: 1(-0.97,0.65) 2(-0.97,0) 3(-0.97,-0.65) 4(0.97,-0.65) 5(0.97,0) 6(0.97,0.65)
  silkscreen extent -1.65,-1.07 0.6,1.07, body extent -1.15,-1.05 1.15,1.05, height 1
"Test-point - 0.5mm" [mm]
  oct 1x1 smd: 1(0,0)
  silkscreen extent -0.68,-0.68 0.68,0.68
U.FL-R-SMT-1(80)_ [mm]
  rect 1.02x1.07 smd: 1(0,-0.974)
  rect 1.07x2.2 smd: 2(1.475,0.974) 3(-1.475,0.974)
  silkscreen extent -1.22,-1.09 1.22,2.21, body extent -1.47,-0.74 1.53,2.36, height 1.2
VEMD8080 [mm]
  rect 0.55x0.54 smd: 1(-1.19,2) 2(-1.19,0.69) 3(-1.19,-0.69) 4(-1.19,-2) 5(1.19,-2) 6(1.19,-0.69) 7(1.19,0.69) 8(1.19,2)
  silkscreen extent -1.83,-2.46 1.25,2.46, body extent -1.25,-2.4 1.25,2.4, height 0.53
WPN252012H1R0MT_ [mm]
  rect 0.85x2 smd: 1(-0.825,0) 2(0.825,0)
  silkscreen extent -0.23,-0.99 0.23,0.99, body extent -1.25,-0.95 1.25,0.95, height 1.14
XCVR_SIM868 [mm]
  oval 1.6x0.6 smd: 1(-7.85,6.05) 2(-7.85,4.95) 3(-7.85,3.85) 4(-7.85,2.75) 5(-7.85,1.65) 6(-7.85,0.55) 7(-7.85,-0.55) 8(-7.85,-1.65) 9(-7.85,-2.75) 10(-7.85,-3.85) 11(-7.85,-4.95) 12(-7.85,-6.05) 22(7.85,-6.05) 23(7.85,-4.95) 24(7.85,-3.85) 25(7.85,-2.75) 26(7.85,-1.65) 27(7.85,-0.55) 28(7.85,0.55) 29(7.85,1.65) 30(7.85,2.75) 31(7.85,3.85) 32(7.85,4.95) 33(7.85,6.05)
  oval 0.6x1.6 smd: 13(-4.4,-8.8) 14(-3.3,-8.8) 15(-2.2,-8.8) 16(-1.1,-8.8) 17(0,-8.8) 18(1.1,-8.8) 19(2.2,-8.8) 20(3.3,-8.8) 21(4.4,-8.8) 34(4.4,8.8) 35(3.3,8.8) 36(2.2,8.8) 37(1.1,8.8) 38(0,8.8) 39(-1.1,8.8) 40(-2.2,8.8) 41(-3.3,8.8) 42(-4.4,8.8)
  rect 1.1x0.9 smd paste-2: 43(-5.35,4.9) 44(-5.35,3.5) 45(-5.35,2.1) 46(-5.35,0.7) 47(-5.35,-0.7) 48(-5.35,-2.1) 49(-5.35,-3.5) 50(-5.35,-4.9) 58(5.35,-4.9) 59(5.35,-3.5) 60(5.35,-2.1) 61(5.35,-0.7) 62(5.35,0.7)
  rect 0.9x1.1 smd paste-2: 51(-4.2,-6.3) 52(-2.8,-6.3) 53(-1.4,-6.3) 54(0,-6.3) 55(1.4,-6.3) 56(2.8,-6.3) 57(4.2,-6.3) 63(2.8,6.3) 64(1.4,6.3) 65(0,6.3) 66(-1.4,6.3) 67(-2.8,6.3) 68(-4.2,6.3)
  rect 2.6x3.1 smd paste-3: 69(-2.9,3.4) 70(-2.9,0) 71(-2.9,-3.4) 72(0,-3.4) 73(2.9,-3.4) 74(2.9,0) 75(2.9,3.4) 76(0,3.4) 77(0,0)
  Keep-Out Layer region: 6.65,2.101 4.502,2.101 4.502,7.4 6.65,7.4
  Keep-Out Layer region: 6.65,2.102 4.504,2.102 4.504,7.4 6.65,7.4
  silkscreen extent -9.6,-8.8 7.85,8.8, body extent -7.85,-8.8 7.85,8.8, height 2.6
XL-1010RGBC-WS2812B [mm]
  rect 0.45x0.45 smd: 1(-0.425,0.425) 2(0.425,0.425) 3(-0.425,-0.425) 4(0.425,-0.425)
  silkscreen extent -0.97,-0.74 1.17,0.74, body extent -0.5,-0.5 0.5,0.5, height 0.81
ZTS6117_ [mm]
  rect 0.6x0.54 smd: 1(-0.525,0.965) 2(-0.525,-0.965) 3(0.525,-0.965) 4(0.525,0.965)
  silkscreen extent -1.25,-1.47 0.99,1.45, body extent -0.92,-1.38 0.93,1.38, height 0.9

## Part data
Ant1: "RF ANT 1.575GHZ CER PATCH SLD", Manufacturer=Taoglas, Supplier Part Number=931-1150-1-ND, ComponentLink1Description=https://datasheet.ciiva.com/4432/ap-10h-01-19479-4432605.pdf?src-supplier=Mouser, ComponentLink1URL=https://datasheet.ciiva.com/4432/ap-10h-01-19479-4432605.pdf?src-supplier=Mouser, ComponentLink2Description=https://datasheet.ciiva.com/2792/ap-10h-01-2792858.pdf?src-supplier=Digikey, ComponentLink2URL=https://datasheet.ciiva.com/2792/ap-10h-01-2792858.pdf?src-supplier=Digikey, ComponentLink3Description=https://datasheet.ciiva.com/2792/ap-10h-01-2792859.pdf?src-supplier=Digikey, ComponentLink3URL=https://datasheet.ciiva.com/2792/ap-10h-01-2792859.pdf?src-supplier=Digikey, ComponentLink4Description=https://datasheet.ciiva.com/2792/ap-10h-01-2792860.pdf?src-supplier=Digikey, ComponentLink4URL=https://datasheet.ciiva.com/2792/ap-10h-01-2792860.pdf?src-supplier=Digikey, Item Type="RF Antennas", Manufacturer Part Number=AP.10H.01, Pricing="1=23.02, 100=17.71 (USD)", RoHS=Yes, Stock=996, Supplier=Digikey
ANT3: library part RFANT3216120A5T, "2.4GHZ CERAMIC CHIP ANTENNA", Case/Package=CSMD, Frequency=2.4GHz, LCSC Part Number=C127629, Manufacturer="Walsin Technologies", Package Quantity=2000, Supplier Part Number=1292-1000-1-ND, Bandwidth=150MHz, Category="RF Antennas", ComponentLink1Description=https://datasheet.ciiva.com/26865/getdatasheetpartid-490374-26865067.pdf?src-supplier=Verical, ComponentLink1URL=https://datasheet.ciiva.com/26865/getdatasheetpartid-490374-26865067.pdf?src-supplier=Verical, ComponentLink2Description=https://datasheet.ciiva.com/26233/1-2rfant3216120a5t-26233244.pdf?src-supplier=Digikey, ComponentLink2URL=https://datasheet.ciiva.com/26233/1-2rfant3216120a5t-26233244.pdf?src-supplier=Digikey, ComponentLink3Description=https://datasheet.ciiva.com/26233/1-2rfant3216120a5t-26233238.pdf?src-supplier=Digikey, ComponentLink3URL=https://datasheet.ciiva.com/26233/1-2rfant3216120a5t-26233238.pdf?src-supplier=Digikey, Impedance=50R, Item Type=Antenna, Manufacturer Part Number=RFANT3216120A5T, Mounting Technology="Surface Mount", Number of Bands=1, Packaging="Tape and Reel", Pins=2, Pricing="1=0.5, 10=0.403, 25=0.3692, 100=0.2747, 250=0.24896, 500=0.20604, 1000=0.15453 (USD)", Radiation Hardening=No, RoHS=Yes, Series=-, Stock=28669, Supplier=Digikey, Termination=Solder, VSWR=2
C1: library part C1005X5R1V225K050BC, "CAP CER 2.2UF 35V X5R 0402", Case Code (Imperial)=0402, Case Code (Metric)=1005, Dielectric=X5R, Dielectric Material=Ceramic, Manufacturer=TDK, Max Operating Temperature=85°C, Min Operating Temperature=-55°C, Package Quantity=1, Supplier Part Number=445-9028-1-ND, Tolerance=10%, Voltage Rating=35V, Case/Package=0402, ComponentLink1Description=https://datasheet.ciiva.com/24218/mlcc-commercial-general-en-24218938.pdf?src-supplier=Mouser, ComponentLink1URL=https://datasheet.ciiva.com/24218/mlcc-commercial-general-en-24218938.pdf?src-supplier=Mouser, Depth=0.5mm, Height=0.5mm, Item Type=Capacitors, Lead Free="Lead Free", Length=1mm, Manufacturer Part Number=C1005X5R1V225K050BC, Material=4241ConductorMaterial, Mounting Technology="Surface Mount", Packaging="Tape and Reel", Pricing="1=0.21, 10=0.123, 50=0.0866, 100=0.0754, 500=0.05646, 1000=0.05055, 2500=0.04429, 5000=0.04049 (USD)", Reach SVHC Compliant=Unknown, RoHS=Yes, RoHS Compliant=Yes, Series=C, Stock=1458755, Supplier=Digikey, Termination=SMD/SMT, Thickness=0.022inch, Voltage Rating (DC)=35V, Weight=2.3E-05oz, Width=0.02inch
C2 C3 C4 C6 C7 C11 C22: library part GRT188R61E106ME13D, "CAP CER 10UF 25V X5R 0603", Case Code (Imperial)=0603, Case Code (Metric)=1608, Dielectric=X5R, LCSC Part Number=C697423, Manufacturer=Murata, Max Operating Temperature=85°C, Min Operating Temperature=-55°C, Package Quantity=4000, Ratings=AEC-Q200, Tolerance=20%, Voltage Rating=25V, Case/Package=0603, ComponentLink1Description=https://datasheet.octopart.com/GRT188R61E106ME13D-Murata-datasheet-149523595.pdf?src-supplier=Newark, ComponentLink1URL=https://datasheet.octopart.com/GRT188R61E106ME13D-Murata-datasheet-149523595.pdf?src-supplier=Newark, ComponentLink2Description=https://datasheet.octopart.com/GRT188R61E106ME13D-Murata-datasheet-82944876.pdf?src-supplier=Future+Electronics, ComponentLink2URL=https://datasheet.octopart.com/GRT188R61E106ME13D-Murata-datasheet-82944876.pdf?src-supplier=Future+Electronics, ComponentLink3Description=http://search.murata.co.jp/Ceramy/image/img/A01X/G101/ENG/GRT188R61E106ME13-01.pdf?src-supplier=Digikey, ComponentLink3URL=http://search.murata.co.jp/Ceramy/image/img/A01X/G101/ENG/GRT188R61E106ME13-01.pdf?src-supplier=Digikey, ComponentLink4Description=https://search.murata.co.jp/Ceramy/image/img/A01X/G101/ENG/GRT188R61E106ME13-01.pdf?src-supplier=Digikey, ComponentLink4URL=https://search.murata.co.jp/Ceramy/image/img/A01X/G101/ENG/GRT188R61E106ME13-01.pdf?src-supplier=Digikey, ComponentLink5Description=https://datasheet.octopart.com/GRT188R61E106ME13D-Murata-datasheet-165579666.pdf?src-supplier=TME, ComponentLink5URL=https://datasheet.octopart.com/GRT188R61E106ME13D-Murata-datasheet-165579666.pdf?src-supplier=TME, Height=0.8mm, Item Type=Capacitors, Length=1.6mm, Manufacturer Part Number=GRT188R61E106ME13D, Material=4241ConductorMaterial, Mounting Technology="Surface Mount", Packaging="Cut Tape", Pricing="4000=0.0522, 8000=0.0514, 12000=0.0509, 20000=0.0503, 40000=0.049 (USD)", RoHS=No, RoHS Compliant=No, Series=GRT, Stock=444000, Supplier="Future Electronics", Termination=Standard, Voltage Rating (DC)=25V, Weight=0.000917oz, Width=0.8mm
C5 C13 C15 C16: library part C1005X5R0J475K050BC, "CAP CER 4.7UF 6.3V X5R 0402", Dielectric Material=4241ConductorMaterial, Manufacturer=TDK, Supplier Part Number=445-5947-1-ND, ComponentLink1Description=https://datasheet.ciiva.com/6252/mlcc-commercial-general-en-6252115.pdf?src-supplier=Digikey, ComponentLink1URL=https://datasheet.ciiva.com/6252/mlcc-commercial-general-en-6252115.pdf?src-supplier=Digikey, Item Type=Capacitors, Lead Free=5697LeadFree, Manufacturer Part Number=C1005X5R0J475K050BC, Material=4241ConductorMaterial, Pricing="1=0.28, 10=0.165, 50=0.1178, 100=0.1032, 500=0.0782, 1000=0.07043, 2500=0.06217, 5000=0.05716 (USD)", RoHS=Yes, Stock=1033379, Supplier=Digikey
C8 C9 C10: library part CL10A226MO7JZNC, "CAP CER 22UF 16V X5R 0603", Case Code (Imperial)=0603, Case Code (Metric)=1608, LCSC Part Number=C2762594, Manufacturer=Samsung, Max Operating Temperature=85°C, Min Operating Temperature=-55°C, Tolerance=20%, Voltage Rating=16V, Case/Package=0603, ComponentLink1Description=http://www.samsungsem.com/kr/support/product-search/mlcc/CL10A226MO7JZNC.jsp?src-supplier=Digikey, ComponentLink1URL=http://www.samsungsem.com/kr/support/product-search/mlcc/CL10A226MO7JZNC.jsp?src-supplier=Digikey, ComponentLink2Description=https://datasheet.octopart.com/CL10A226MO7JZNC-Samsung-Electro-Mechanics-datasheet-149156497.pdf?src-supplier=Future+Electronics, ComponentLink2URL=https://datasheet.octopart.com/CL10A226MO7JZNC-Samsung-Electro-Mechanics-datasheet-149156497.pdf?src-supplier=Future+Electronics, Height=900um, Item Type=Capacitors, Manufacturer Part Number=CL10A226MO7JZNC, Material=4241ConductorMaterial, Mounting Technology="Surface Mount", Packaging="Cut Tape", Pricing="1=0.65, 10=0.391, 50=0.2884, 100=0.2564, 500=0.20198, 1000=0.18499 (USD)", RoHS=Yes, RoHS Compliant=Yes, Series=CL, Stock=944984, Supplier=Digikey
C12: library part GRM155R71H104KE14D, "CAP CER 0.1UF 50V X7R 0402", Case Code (Imperial)=0402, Case Code (Metric)=1005, Dielectric=X7R, Dielectric Material=Ceramic, LCSC Part Number=C77020, Manufacturer=Murata, Max Operating Temperature=125°C, Min Operating Temperature=-55°C, Package Quantity=10000, Tolerance=10%, Voltage=50V, Case/Package=0402, ComponentLink1Description=http://www.farnell.com/datasheets/2079156.pdf?src-supplier=Farnell, ComponentLink1URL=http://www.farnell.com/datasheets/2079156.pdf?src-supplier=Farnell, ComponentLink2Description=http://www.mouser.com/ds/2/281/c02e-2905.pdf?src-supplier=Mouser, ComponentLink2URL=http://www.mouser.com/ds/2/281/c02e-2905.pdf?src-supplier=Mouser, ComponentLink3Description=https://datasheet.octopart.com/GRM155R71H104KE14D-Murata-datasheet-22122223.pdf?src-supplier=Future+Electronics, ComponentLink3URL=https://datasheet.octopart.com/GRM155R71H104KE14D-Murata-datasheet-22122223.pdf?src-supplier=Future+Electronics, ComponentLink4Description=http://www.farnell.com/datasheets/2079156.pdf?src-supplier=Newark, ComponentLink4URL=http://www.farnell.com/datasheets/2079156.pdf?src-supplier=Newark, ComponentLink5Description=https://datasheet.octopart.com/GRM155R71H104KE14D-Murata-datasheet-66077078.pdf?src-supplier=Element14, ComponentLink5URL=https://datasheet.octopart.com/GRM155R71H104KE14D-Murata-datasheet-66077078.pdf?src-supplier=Element14, ComponentLink6Description=https://search.murata.co.jp/Ceramy/image/img/A01X/G101/ENG/GRM155R71H104KE14-01.pdf?src-supplier=Digikey, ComponentLink6URL=https://search.murata.co.jp/Ceramy/image/img/A01X/G101/ENG/GRM155R71H104KE14-01.pdf?src-supplier=Digikey, Construction=Flat, Depth=0.5mm, Dissipation Factor=0.025%, Height=0.5mm, Item Type=Capacitors, Lead Free=5697LeadFree, Length=1mm, Manufacturer Part Number=GRM155R71H104KE14D, Material=Ceramic, Mounting Technology="Surface Mount", Packaging="Tape and Reel", Pins=2NUMBER, Pricing="10000=0.0034, 40000=0.0033, 150000=0.0032, 250000=0.0031, 500000=0.003 (USD)", Reach SVHC Compliant=No, RoHS=Yes, RoHS Compliant=Yes, Series=GRM, Stock=45820000, Supplier="Future Electronics", Termination=SMD/SMT, Thickness=0.022inch, Voltage Rating=50V, Voltage Rating (DC)=50V, Weight=0.000212oz, Width=0.5mm
C14: library part C1005X5R0J225K050BC, "CAP CER 2.2UF 6.3V X5R 0402", Dielectric Material=4241ConductorMaterial, Manufacturer=TDK, Supplier Part Number=445-6847-1-ND, ComponentLink1Description=https://datasheet.ciiva.com/24216/c1005x5r0j225k050bc-264406-24216408.pdf?src-supplier=Mouser, ComponentLink1URL=https://datasheet.ciiva.com/24216/c1005x5r0j225k050bc-264406-24216408.pdf?src-supplier=Mouser, ComponentLink2Description=https://datasheet.ciiva.com/23802/1796654-23802728.pdf?src-supplier=Newark, ComponentLink2URL=https://datasheet.ciiva.com/23802/1796654-23802728.pdf?src-supplier=Newark, ComponentLink3Description=https://datasheet.ciiva.com/28450/1796654-28450934.pdf?src-supplier=Element14, ComponentLink3URL=https://datasheet.ciiva.com/28450/1796654-28450934.pdf?src-supplier=Element14, ComponentLink4Description=https://datasheet.ciiva.com/28665/mlcc-commercial-general-en-28665478.pdf?src-supplier=Element14, ComponentLink4URL=https://datasheet.ciiva.com/28665/mlcc-commercial-general-en-28665478.pdf?src-supplier=Element14, ComponentLink5Description=https://datasheet.ciiva.com/6291/tdkmlcccaprange-6291126.pdf?src-supplier=Digikey, ComponentLink5URL=https://datasheet.ciiva.com/6291/tdkmlcccaprange-6291126.pdf?src-supplier=Digikey, ComponentLink6Description=https://datasheet.ciiva.com/6291/tdkmlcccaprange-6291128.pdf?src-supplier=Digikey, ComponentLink6URL=https://datasheet.ciiva.com/6291/tdkmlcccaprange-6291128.pdf?src-supplier=Digikey, Item Type=Capacitors, Lead Free=5697LeadFree, Manufacturer Part Number=C1005X5R0J225K050BC, Material=4241ConductorMaterial, Pins=2NUMBER, Pricing="1=0.18, 10=0.102, 50=0.0718, 100=0.0624, 500=0.04634, 1000=0.04135, 2500=0.03605, 5000=0.03284 (USD)", RoHS=Yes, Stock=1434689, Supplier=Digikey